# Altium PCB MCU_1.1.PcbDoc
Units mm, origin at the board's own origin, x right, y up, seen from the top; angles counter-clockwise.
Board outline 44.51 x 46.48 mm, 2 copper layers (Top Layer, Bottom Layer); 28 components, 35 nets, 165 pads, 109 vias.
Unrouted connection lines stored in the file: 1.
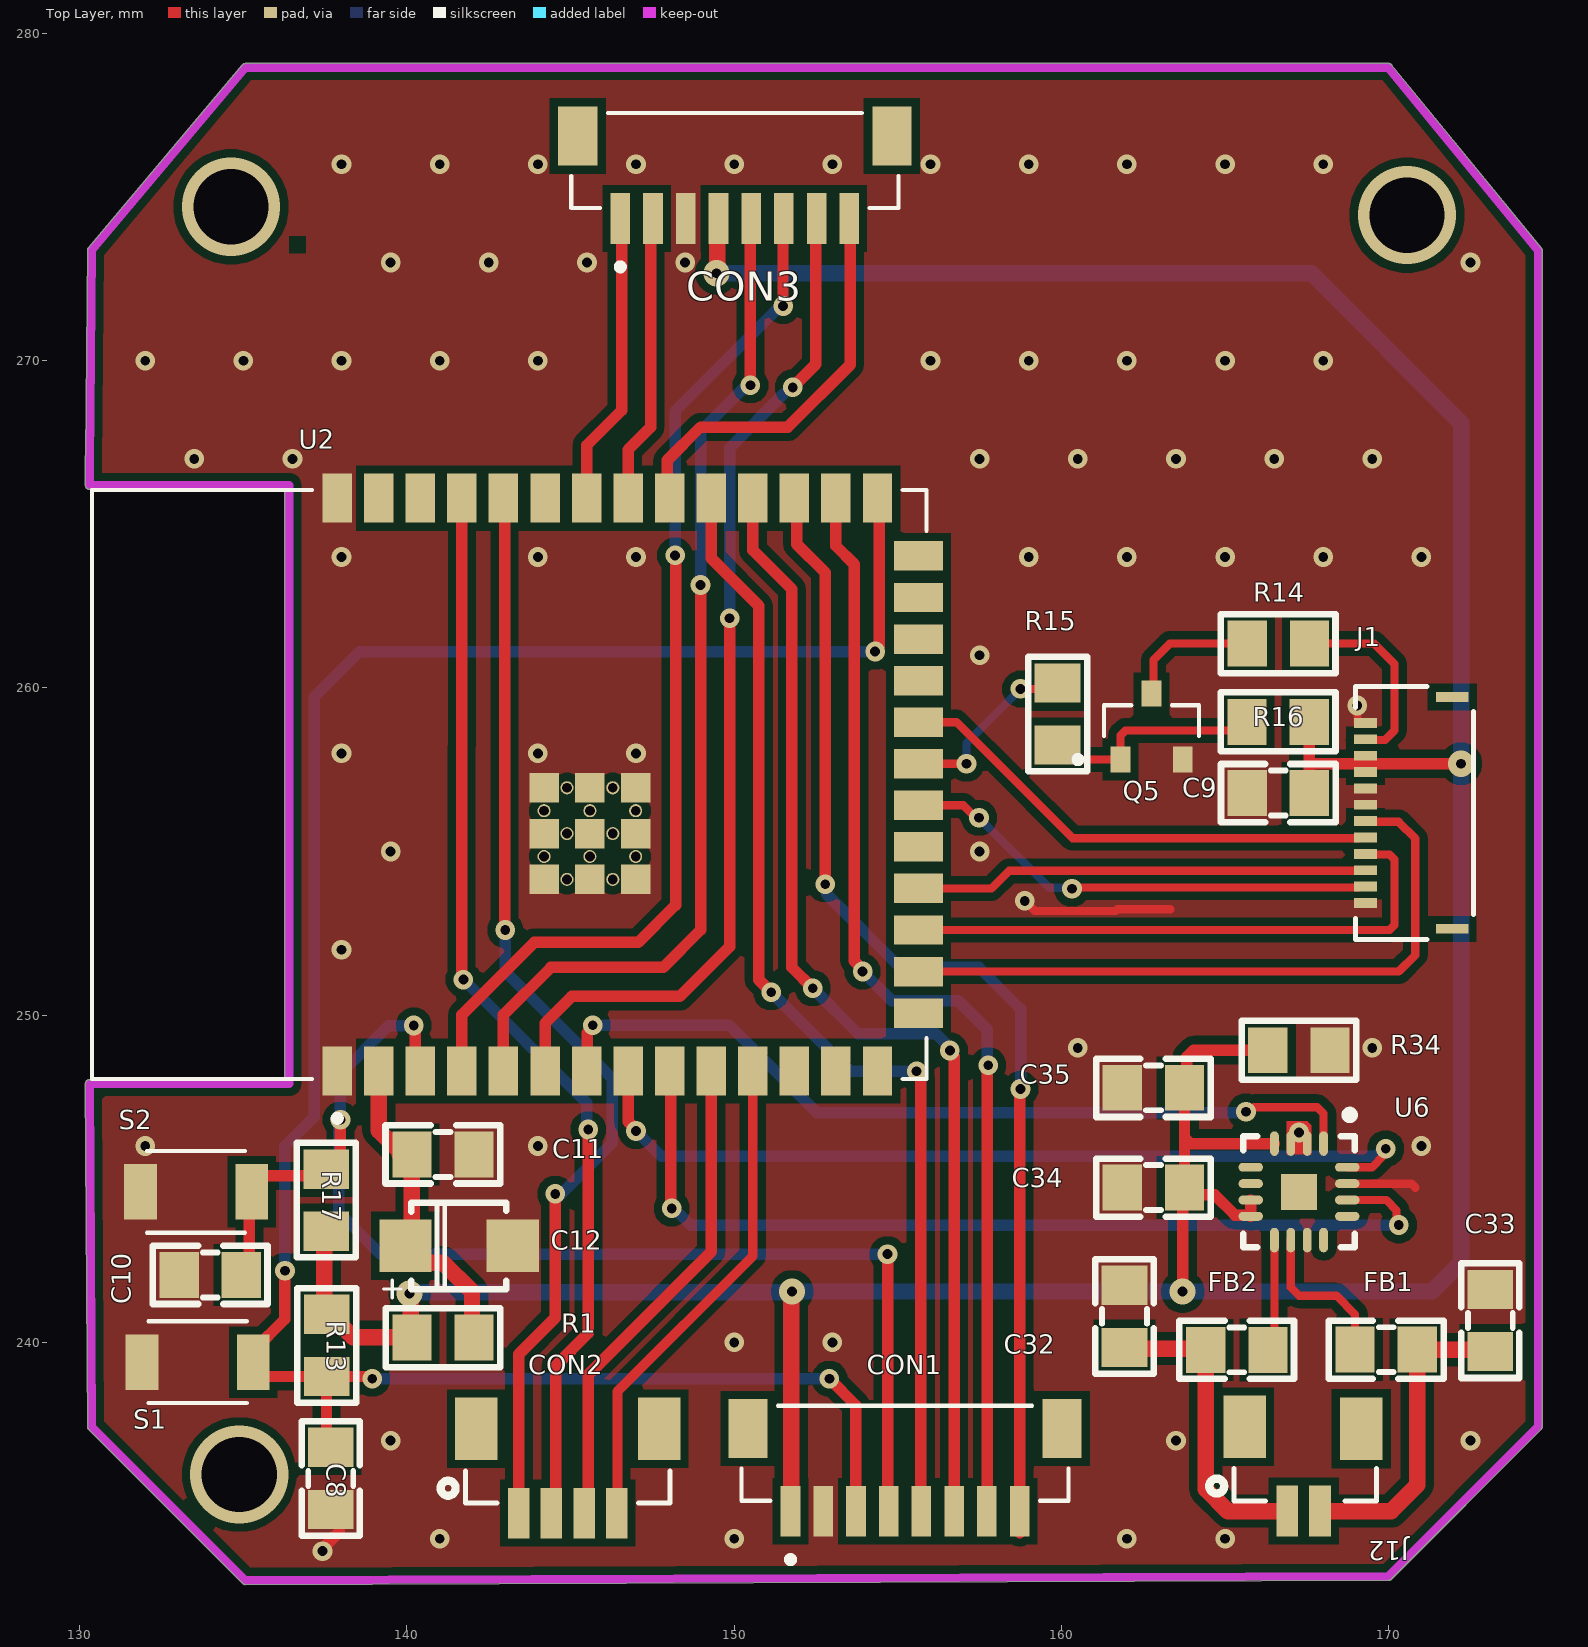
[diagram p0: Top Layer view]
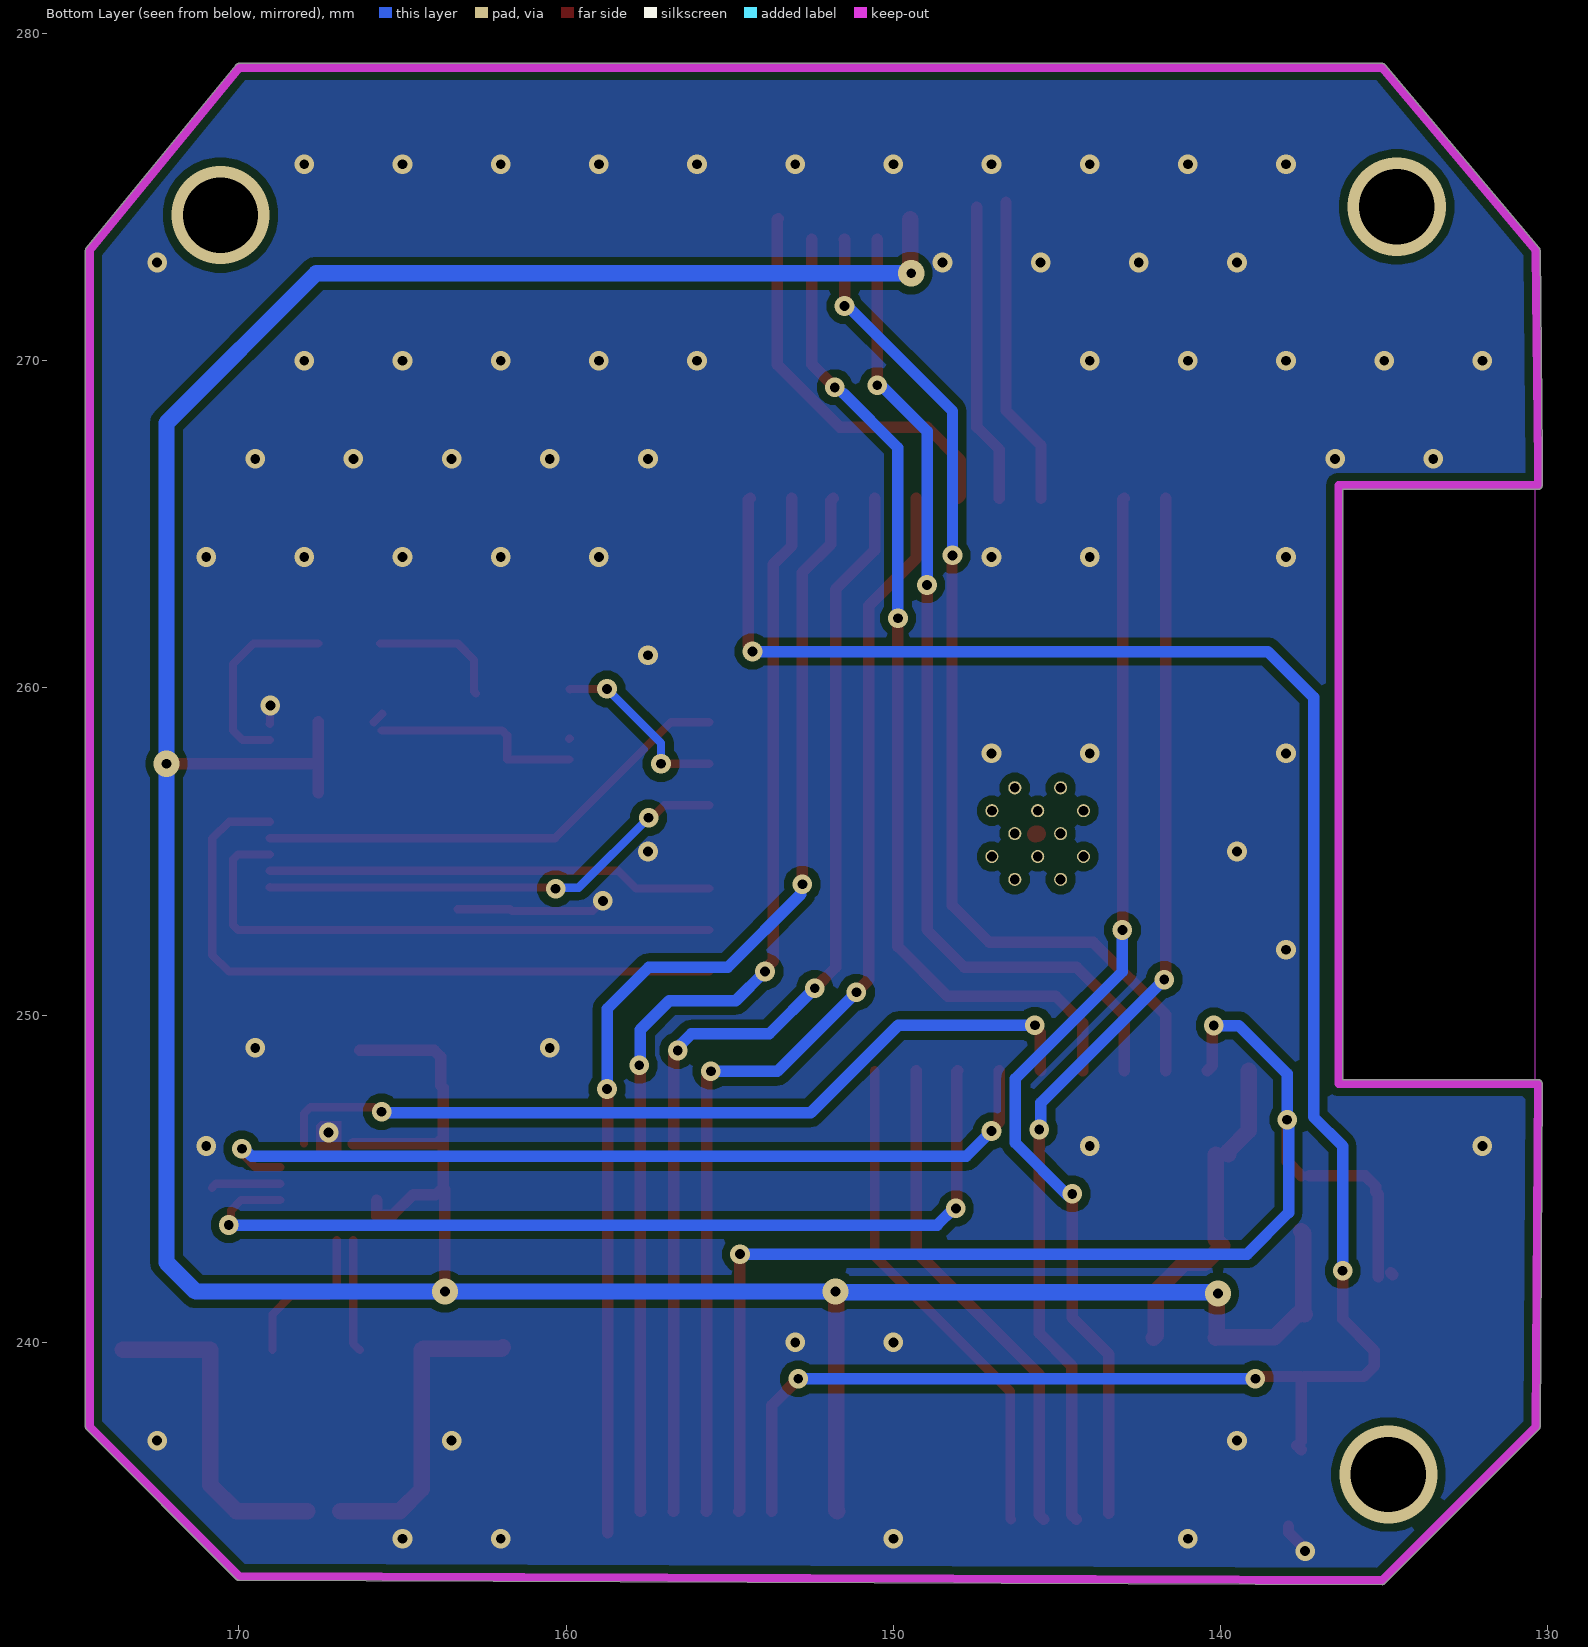
[diagram p1: Bottom Layer view, seen from below]
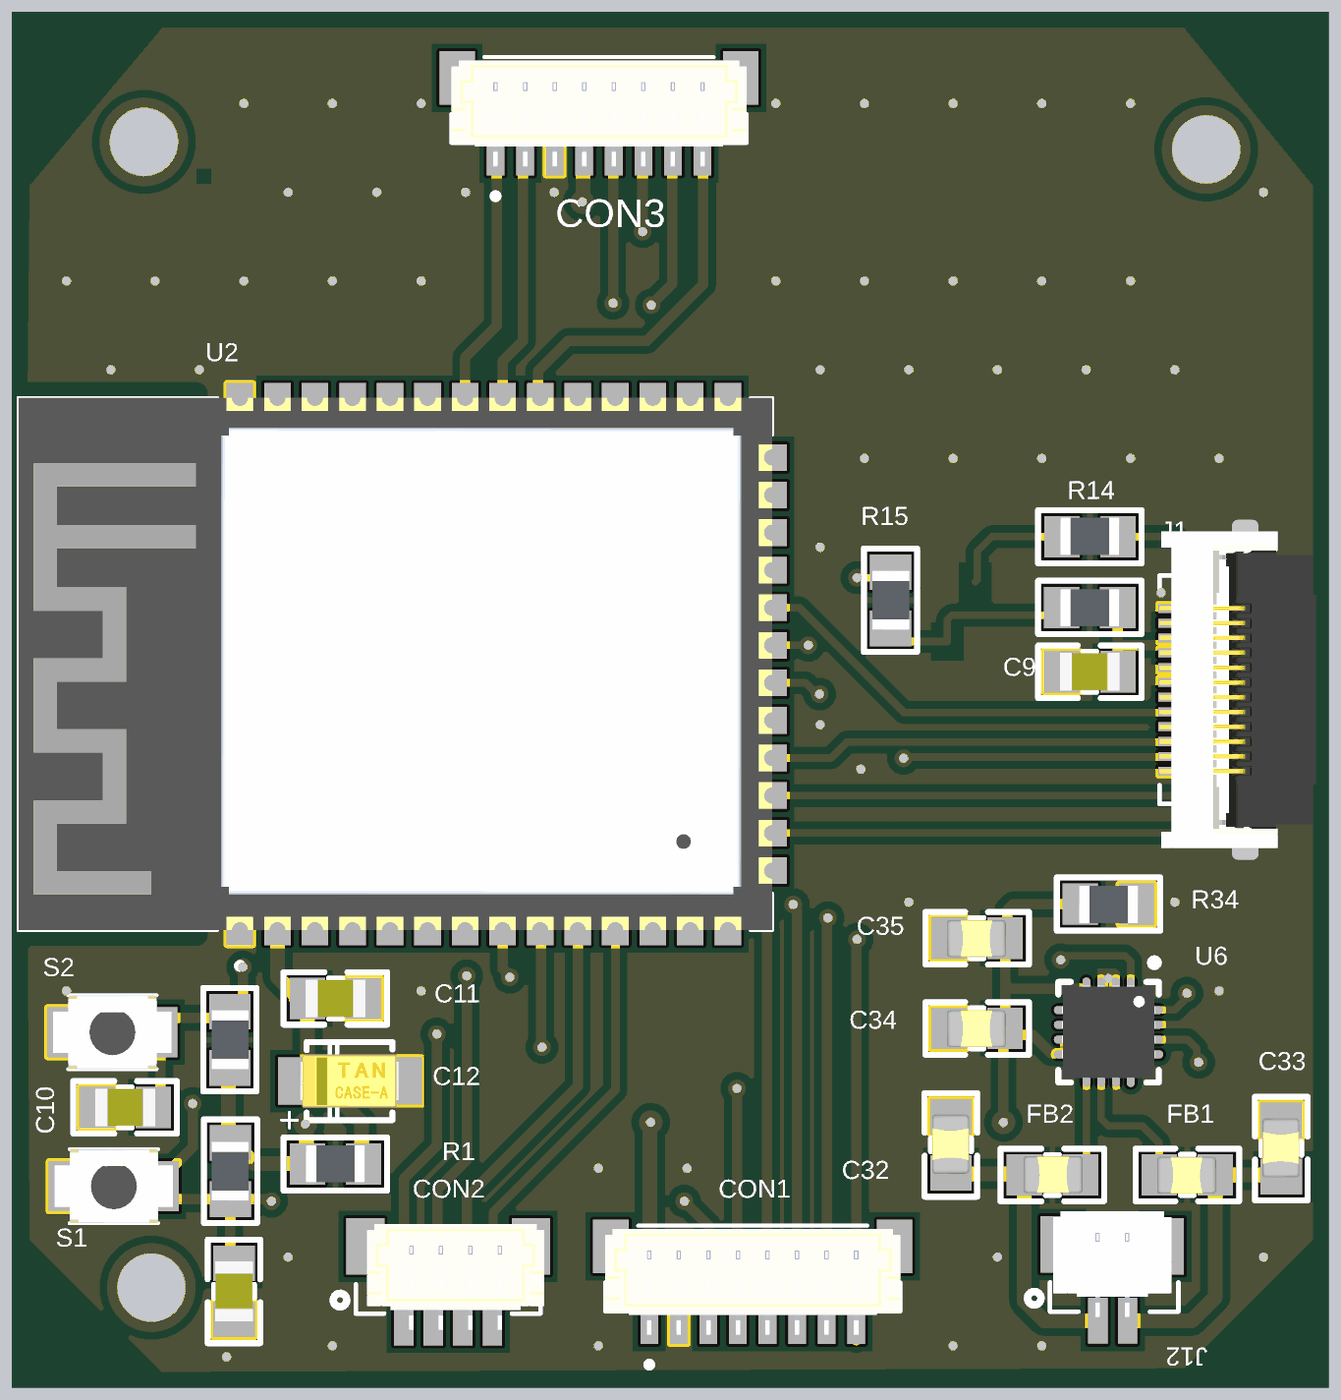
[diagram p2: 3D render of the assembled board from above, using the file's embedded part models]

## Layer stack, top to bottom
Top Solder: solder mask 0.0102, Solder Resist, Dk 3.5
Top Layer: signal copper 0.0356
Dielectric 1: dielectric 0.32, FR-4, Dk 4.8
Bottom Layer: signal copper 0.0356
Bottom Solder: solder mask 0.0102, Solder Resist, Dk 3.5

## Board outline
130.238,237.426 130.175,247.903 cw(c130.302,247.904) 130.302,248.031 136.271,248.031 136.271,266.065 130.302,266.065 cw(c130.302,266.192) 130.175,266.192 130.175,267.081 cw(c130.302,267.081) 130.177,267.106 130.238,273.369 cw(c130.366,273.367) 130.268,273.449 134.967,279.037 cw(c135.064,278.956) 135.064,279.083 169.989,279.083 cw(c169.99,278.956) 170.088,279.036 174.66,273.448 cw(c174.561,273.368) 174.689,273.368 174.689,237.427 cw(c174.562,237.426) 174.651,237.336 170.08,232.764 cw(c169.99,232.854) 169.99,232.727 135.065,232.6 cw(c135.064,232.727) 134.974,232.638 130.275,237.336 cw(c130.365,237.426)

## Design rules (kind name [scope] priority, off if disabled: settings)
Clearance [All] p1: gap=0.254 ignorepadtopadclearanceinfootprint=FALSE
DiffPairsRouting [All] p1: maxlimit=0.254 minlimit=0.127 mostfreqgap=0.254 toplayer_minwidth=0.254 toplayer_maxwidth=0.508 toplayer_prefwidth=0.381 bottomlayer_minwidth=0.254 bottomlayer_maxwidth=0.508 bottomlayer_prefwidth=0.381 maxuncoupledlength=12.7
PolygonConnect [All] p1: connectstyle=Direct reliefconductorwidth=0.254 reliefentries=4 polygonreliefangle="90 Angle" airgapwidth=0.254
RoomDefinition MCU [InComponentClass('MCU')] p1: confinementstyle=ConfineIn formatcopy=TRUE lockcomponents=FALSE outline 0,0 50.8,0 50.8,25.4 0,25.4
RoutingVias [All] p1: holewidth=0.3 width=0.6 viastyle="Through Hole" minholewidth=0.3 minwidth=0.6 maxholewidth=0.3 maxwidth=0.6
SolderMaskExpansion [All] p1: expansion=0.102 istentingtop=FALSE
Width [All] p1: maxlimit=0.5 minlimit=0.254 preferedwidth=0.35
29 further rules are at their usual default settings.

## Components (designator, comment, footprint, x,y, rotation, side; value= is the part's Value field where it differs from the comment)
C8 "104" "tu 0805" 137.668,235.839 r90 top
C9 "104" "tu 0805" 166.628,256.786 r180 top
C10 "104" "tu 0805" 133.985,242.062 r0 top
C11 "104" "tu 0805" 141.097,245.745 r0 top
C12 "10uF" CAP-TANTAL-1206(3216) 141.58,242.951 r0 top
C32 "220pF" "Cap 0805" 161.925,240.792 r90 top
C33 "220pF" "Cap 0805" 173.101,240.665 r90 top
C34 "10uF" "Cap 0805" 162.814,244.729 r180 top
C35 "0.1uF" "Cap 0805" 162.814,247.777 r180 top
CON1 "Header 8pin 1.0mm" JST_BM08B-SRSS-TB(LF)(SN) 155.22,236.613 r0 top
CON2 "Header 4pin 1.0mm" "CONN4_BM04B-SRSS_JST - duplicate" 144.913,236.665 r0 top
CON3 "Header 8pin 1.0mm" JST_BM08B-SRSS-TB(LF)(SN) 150.019,276.118 r0 top
FB1 "?" "Cap 0805" 169.926,239.776 r180 top
FB2 "?" "Cap 0805" 165.354,239.776 r0 top
J1 "TFT_1.54 inch" "FPC 12pin 0,5mm" 170.791,256.179 r90 top
J12 "Header 2pin 1.0mm_1" CONN2_BM02B-SRSS_JST 168.402,236.728 r0 top
Q5 "SS8050CTA" "SS8050 SMD" 627.065,827.653 r90 top
R1 "0R" "RES 0805" 141.097,240.157 r0 top
R13 "10K" "RES 0805" 137.541,239.903 r90 top
R14 "10R" "RES 0805" 166.624,261.366 r0 top
R15 "1K" "RES 0805" 159.893,259.207 r270 top
R16 "10K" "RES 0805" 166.624,258.953 r180 top
R17 "10K" "RES 0805" 137.541,244.348 r270 top
R34 "1M" "RES 0805" 167.259,248.92 r180 top
S1 "SW-SMD" SW_B3U-1000P 133.604,239.395 r180 top
S2 "SW-SMD" SW_B3U-1000P 133.555,244.602 r180 top
U2 "ESP32-S3-WROOM-1-N8R2" XCVR_ESP32-S3-WROOM-1-N8R2 143.129,257.048 r90 top
U6 "MAX98357A" QFN16N-3X3 167.259,244.602 r270 top

## Footprints (in the part's own frame and the unit in brackets; to place one, negate y for a bottom-side part, rotate by r counter-clockwise, add the part's x,y. Pads: shape width x height; smd on the part's side, far side on the other; paste and mask are expansions set on the pad)
"Cap 0805" [mm] "Compoment SMD 80x50mil"
  rect 1.2x1.4 smd: 1(-0.946,-0.003) 2(0.954,-0.003)
  silkscreen extent -1.75,-0.89 1.75,0.89, body extent -0.97,-0.61 1.03,0.64, height 1.23
CAP-TANTAL-1206(3216) [mm]
  rect 1.6x1.6 smd: 1(-1.626,0) 2(1.651,0)
  silkscreen extent -2.3,-1.59 1.45,1.32, body extent -1.7,-0.9 1.7,0.9, height 1.8
CONN2_BM02B-SRSS_JST [mil]
  rect 26x61 smd: 1(-59.06,-74.1) 2(-19.69,-74.1)
  rect 51x75 smd: 5(-110.24,27.47) 6(30,25)
  silkscreen extent -153,-62 48,-23, body extent -119,-70 39,72, height 167
"CONN4_BM04B-SRSS_JST - duplicate" [mil]
  rect 26x61 smd: 1(-59.06,-74.1) 2(-19.69,-74.1) 3(19.68,-74.1) 4(59.06,-74.1)
  rect 51x75 smd: 5(-110.24,27.47) 6(110.24,27.47)
  silkscreen extent -153,-62 123,-23, body extent -108,-85 128,57, height 171
"FPC 12pin 0,5mm" [mm]
  rect 0.3x0.7 smd: 1(-2.75,1.5) 2(-2.25,1.5) 3(-1.75,1.5) 4(-1.25,1.5) 5(-0.75,1.5) 6(-0.25,1.5) 7(0.25,1.5) 8(0.75,1.5) 9(1.25,1.5) 10(1.75,1.5) 11(2.25,1.5) 12(2.75,1.5)
  rect 0.3x1 smd: P1(-3.54,-1.15) P2(3.54,-1.15)
  silkscreen extent -3.86,-1.8 3.86,1.8, body extent -5.75,-3.49 5.75,1.81, height 1.9
JST_BM08B-SRSS-TB(LF)(SN) [mm]
  rect 0.6x1.55 smd: 1(-3.5,-1.775) 2(-2.5,-1.775) 3(-1.5,-1.775) 4(-0.5,-1.775) 5(0.5,-1.775) 6(1.5,-1.775) 7(2.5,-1.775) 8(3.5,-1.775)
  rect 1.2x1.8 smd: S1(-4.8,0.75) S2(4.8,0.75)
  silkscreen extent -5,-3.35 5,1.45, body extent -5,-2.27 5,1.33, height 4.25
QFN16N-3X3 [mm]
  oval 0.75x0.27 smd: 1(-1.475,0.75) 2(-1.475,0.25) 3(-1.475,-0.25) 4(-1.475,-0.75) 9(1.475,-0.75) 10(1.475,-0.25) 11(1.475,0.25) 12(1.475,0.75)
  oval 0.27x0.75 smd: 5(-0.75,-1.475) 6(-0.25,-1.475) 7(0.25,-1.475) 8(0.75,-1.475) 13(0.75,1.475) 14(0.25,1.475) 15(-0.25,1.475) 16(-0.75,1.475)
  rect 1.1x1.1 smd: 17(0,0)
  silkscreen extent -2.47,-1.7 1.7,1.7, body extent -1.57,-1.57 1.57,1.57, height 0.75
"RES 0805" [mm]
  rect 1.2x1.4 smd: 1(-0.946,-0.01) 2(0.954,-0.01)
  silkscreen extent -1.75,-0.91 1.75,0.89, body extent -1,-0.62 1,0.63, height 0.5
"SS8050 SMD" [mm]
  rect 0.8x0.6 smd: 1(-569.843,465.262) 2(-569.843,463.362) 3(-567.823,464.312)
  silkscreen extent -569.94,462.86 -568.18,466.66
SW_B3U-1000P [mm]
  rect 1x1.7 smd: 1(-1.7,0) 2(1.7,0)
  silkscreen extent -1.5,-1.25 1.5,1.25, body extent -2,-1.25 2,1.25, height 1.75
"tu 0805" [mm] "Compoment SMD 80x50mil"
  rect 1.2x1.4 smd: 1(-0.946,-0.003) 2(0.954,-0.003)
  silkscreen extent -1.75,-0.89 1.75,0.89, body extent -1.01,-0.64 1.01,0.63, height 0.61
XCVR_ESP32-S3-WROOM-1-N8R2 [mm]
  rect 1.5x0.9 smd: 1(-8.75,5.26) 2(-8.75,3.99) 3(-8.75,2.72) 4(-8.75,1.45) 5(-8.75,0.18) 6(-8.75,-1.09) 7(-8.75,-2.36) 8(-8.75,-3.63) 9(-8.75,-4.9) 10(-8.75,-6.17) 11(-8.75,-7.44) 12(-8.75,-8.71) 13(-8.75,-9.98) 14(-8.75,-11.25) 27(8.75,-11.25) 28(8.75,-9.98) 29(8.75,-8.71) 30(8.75,-7.44) 31(8.75,-6.17) 32(8.75,-4.9) 33(8.75,-3.63) 34(8.75,-2.36) 35(8.75,-1.09) 36(8.75,0.18) 37(8.75,1.45) 38(8.75,2.72) 39(8.75,3.99) 40(8.75,5.26)
  rect 0.9x1.5 smd: 15(-6.985,-12.5) 16(-5.715,-12.5) 17(-4.445,-12.5) 18(-3.175,-12.5) 19(-1.905,-12.5) 20(-0.635,-12.5) 21(0.635,-12.5) 22(1.905,-12.5) 23(3.175,-12.5) 24(4.445,-12.5) 25(5.715,-12.5) 26(6.985,-12.5)
  rect 0.9x0.9 smd: 41_1(-1.5,-2.46) 41_2(-2.9,-2.46) 41_3(-0.1,-2.46) 41_4(-2.9,-3.86) 41_5(-1.5,-3.86) 41_6(-0.1,-3.86) 41_7(-2.9,-1.06) 41_8(-1.5,-1.06) 41_9(-0.1,-1.06)
  round 0.4 hole 0.3 mask+0: 41_10(-1.5,-1.76) 41_11(-2.9,-1.76) 41_12(-0.1,-1.76) 41_13(-2.9,-3.16) 41_14(-1.5,-3.16) 41_15(-0.1,-3.16) 41_16(-2.2,-1.06) 41_17(-0.8,-1.06) 41_18(-2.2,-2.46) 41_19(-0.8,-2.46) 41_20(-2.2,-3.86) 41_21(-0.8,-3.86)
  Keep-Out Layer region: 9,6.75 -9,6.75 -9,12.75 9,12.75
  Keep-Out Layer region: 9,6.75 -9,6.75 -9,12.75 9,12.75
  silkscreen extent -10.3,-12.75 9,12.75, body extent -9,-12.75 9,12.75, height 3.25

## Part data
C8 C9 C10 C11: library part "Tu 0805 104 50V 10%", "Dán", Chung_Loai=Dán, Don_Vi=Con, Ma_Hang=MH004551, So_Chan=2, Ten_Linh_Kien="Tụ 0805 104-100nF 10% 50V"
C12: library part "CAP TANTAL", "CASE-____-18(mm) Tantalum Capacitors"
C32 C33 C34 C35: library part "Cap 0805", "Capacitor SMD 0805"
CON1 CON3: "SH Series 8 Position 1 mm Pitch Surface Mount Side Entry Shrouded Header", Package=None, Availability=Unavailable, MF="{'manufacturer': u'JST Sales America Inc.'}", MP=SM08B-SRSS-TB, Price=None
CON2 J12: "Connector Header Surface Mount, Right Angle 4 position 0.039 (1.00mm)", Package=None, Check_prices=https://www.snapeda.com/parts/SM04B-SRSS-TB/JST/view-part/?ref=eda, MF="JST Sales", MP=SM04B-SRSS-TB, SnapEDA_Link=https://www.snapeda.com/parts/SM04B-SRSS-TB/JST/view-part/?ref=snap
FB1 FB2: library part "Cap 0805", "errite Bead   0603 MMZ1608B121C - 120 Ohm @ 100MHz, 600mA, 0.15 Ohm DC Resistance - Digikey: 445-2164-1-ND  BK1608HW121-T - 120 Ohm, 600mA Ferrite Chip - Digikey: 587-1876-2-ND       0805 HZ0805B272R-10 - 2.7K Ohm @ 100MHz, 200mA, 0.8 Ohm DC Resistance - Digikey: 240-2504-1-ND (see also Murata BLM21BD272SN1L)  MMZ2012Y152B - 1.5K Ohm @ 100MHz, 500mA, 0.4 Ohm DC Resistance - Digikey: 445-1560-1-ND - Mainly for high frequency (80-400MHz)  MMZ2012R102A - 1K Ohm @ 100MHz, 500mA, 0.3 Ohm DC Resistance - Digikey: 445-1555-2-ND - More general purpose (10-200MHz)"
J1: library part "FPC 12pin", "FPC 12pin 0,5mm", Package=None, Availability=Unavailable, MF="{'manufacturer': u'Molex'}", MP=5034801200, Price=None
R1 R13 R14 R15 R16 R17 R34: library part "RES 0805", "RES SMD 0805", Manufacturer="Vishay Dale", Manufacturer Part Number=CRCW040210K0FKED, Operating Temperature="-55°C ~ 155°C", Package / Case="0402 (1005 Metric)", Power (Watts)="0.063W, 1/16W", Resistance (Ohms)=10k, Supplier Part Number 1=541-10.0KLCT-ND, Temperature Coefficient=±100ppm/°C, Tolerance=±1%, Category=Resistors, ComponentLink1Description=http://www.vishay.com/docs/20035/dcrcwe3.pdf, ComponentLink1URL=http://www.vishay.com/docs/20035/dcrcwe3.pdf, Composition="Thick Film", Features="Automotive AEC-Q200", Height="0.016\" (0.40mm)", Number of Terminations=2, Packaging="Cut Tape (CT)", Pricing 1="10=0.083, 50=0.0444, 200=0.0255, 1000=0.0174 (USD)", RoHS="RoHS Compliant", Size / Dimension="0.039\" L x 0.020\" W (1.00mm x 0.50mm)", Stock 1=2392462, Supplier 1=Digi-Key, Supplier Device Package="0402 (1005 Metric)"
S1 S2: "Switch", LatestRevisionDate=17-Jul-2002, LatestRevisionNote="Re-released for DXP Platform.", PackageReference=SPST-2, Published=24-Mar-1999, Publisher="Altium Limited"
U2: "WiFi 802.11a/b/g/n, Bluetooth v5.0 Transceiver Module 2.4GHz Antenna Not Included -", Package="- Espressif Systems", Availability="In Stock", Check_prices=https://www.snapeda.com/parts/ESP32-S3-WROOM-1-N8R2/Espressif+Systems/view-part/?ref=eda, MF="Espressif Systems", MP=ESP32-S3-WROOM-1-N8R2, Price=None, Purchase-URL=https://pricing.snapeda.com/search?q=ESP32-S3-WROOM-1-N8R2&ref=eda, SnapEDA_Link=https://www.snapeda.com/parts/ESP32-S3-WROOM-1-N8R2/Espressif+Systems/view-part/?ref=snap

## Via types
v1: diameter 0.6, hole 0.3, Top Layer to Bottom Layer, tented both sides, 101 vias
v2: diameter 0.8, hole 0.3, Top Layer to Bottom Layer, tented both sides, 5 vias
v3: diameter 3, hole 2.3, Top Layer to Bottom Layer, 3 vias

## Nets (pads, with @x,y where several pads share a name; then routed paths per layer and width w, separated by ;. In a path a pad name is that pad's centre, name@x,y a point inside that pad or via, vN(x,y) a via of type N, cw(c..) or ccw(c..) an arc to the next point about the centre after c; other vN are vias at no path point)
EN: C10.2 CON1.4 R17.1 S2.1 U2.3 | length 40.6
  Top Layer w0.35: C10.2@134.735,242.062 C10.2@134.805,242.131 ; C10.2@135.186,242.004 135.186,244.533 S2.1 135.255,244.761 135.58,245.086 R17.1@137.287,245.086 ; R17.1@137.541,245.098 137.967,245.524 v1(137.967,246.806) ; v1(140.208,249.682) 140.256,249.634 140.256,248.451 U2.3 ; v1(154.686,242.697) 154.69,242.693 154.69,234.868 CON1.4
  Bottom Layer w0.35: v1@137.922,246.761 137.922,243.967 139.192,242.697 v1(154.686,242.697) ; v1(137.967,246.806) 137.967,248.203 139.446,249.682 v1(140.208,249.682)
GND: C8.1 C9.2 C10.1 C11.2 C12.2 C32.2 C33.2 C34.2 C35.2 CON1.2 CON3.3 J1.1 J1.7 J1.8 J1.12 Q5.2 R34.1 S1.2 S2.2 U2.1 U2.40 U2.41_1 U2.41_2 U2.41_3 U2.41_4 U2.41_5 U2.41_6 U2.41_7 U2.41_8 U2.41_9 U6.2 U6.3 U6.11 U6.15 | length 8.7
  Top Layer w0.254: v1(158.877,253.492) 159.188,253.181 161.652,253.181 161.709,253.238 163.322,253.238 ; U6.3@167.134,246.077 167.134,246.195 167.259,246.32 v1(167.259,246.413) ; U6.15 170.692,244.852 170.815,244.729 ; v1(169.037,259.461) 169.049,259.449 169.049,258.921 J1.12@169.061,258.909
  Top Layer w0.35: v1(137.417,233.623) 137.417,233.691 137.925,234.199 C8.1@137.925,234.385
  Top Layer w0.5: U2.41_1 145.645,255.548 U2.41_1@145.669,255.524
  other v1: 141,234 150,234 162,234 165,234 139.5,237 163.5,237 172.5,237 150,240 153,240 132,246 144,246 171,246 160.5,249 169.5,249 138,252 139.5,255 157.5,255 138,258 144,258 147,258 157.5,261 138,264 144,264 147,264 159,264 162,264 165,264 168,264 171,264 133.5,267 136.5,267 157.5,267 160.5,267 163.5,267 166.5,267 169.5,267 132,270 135,270 138,270 141,270 144,270 156,270 159,270 162,270 165,270 168,270 139.5,273 142.5,273 145.5,273 148.5,273 172.5,273 138,276 141,276 144,276 147,276 150,276 153,276 156,276 159,276 162,276 165,276 168,276
IO0: C8.2 CON1.3 R13.1 S1.1 U2.27 | length 67.9
  Top Layer w0.35: v1(136.271,242.189) 136.271,240.712 135.304,239.745 S1.1 135.304,239.282 135.629,238.957 137.424,238.957 137.541,238.84 C8.2@137.541,236.977 ; C8.2@137.541,236.723 C8.2@137.668,236.85 ; R13.1 138.868,238.957 v1(138.938,238.887) ; v1(152.908,238.887) 153.72,238.075 CON1.3 ; v1(154.305,261.112) 154.305,261.18 154.431,261.306 154.431,265.746 U2.27
  Bottom Layer w0.35: v1(136.271,242.189) 136.271,245.999 137.16,246.888 137.16,259.715 138.557,261.112 v1(154.305,261.112) ; v1(138.938,238.887) v1(152.908,238.887)
IO4: CON3.6 U2.4 | length 31.5
  Top Layer w0.35: U2.4 141.679,250.01 143.891,252.222 147.066,252.222 148.209,253.365 148.209,264.033 v1(148.193,264.049) ; v1(151.495,271.669) 151.495,271.78 151.491,271.784 151.491,273.707 CON3.6@151.495,273.711
  Bottom Layer w0.35: v1(148.193,264.049) 148.193,268.462 v1@151.511,271.78
IO5: CON3.5 U2.5 | length 30.5
  Top Layer w0.35: U2.5 142.949,250.01 144.399,251.46 147.828,251.46 148.971,252.603 v1(148.971,263.144) ; v1(150.495,269.248) CON3.5@150.495,273.711
  Bottom Layer w0.35: v1(148.971,263.144) 148.971,267.843 v1@150.368,269.24
IO6: CON3.7 U2.6 | length 30.5
  Top Layer w0.35: U2.6 144.219,249.756 145.034,250.571 148.336,250.571 149.86,252.095 v1(149.86,262.128) ; v1(151.79,269.185) 151.79,269.189 152.495,269.894 CON3.7@152.495,273.711
  Bottom Layer w0.35: v1(149.86,262.128) 149.86,267.335 151.511,268.986
IO7: U2.7 U6.1 | length 26
  Top Layer w0.254: v1(165.639,247.046) 165.733,247.046 165.875,247.188 167.814,247.188 168.009,246.993 U6.1
  Top Layer w0.35: U2.7 145.516,248.324 145.516,249.461 145.676,249.622 v1(145.676,249.689)
  Bottom Layer w0.35: v1(145.676,249.689) 149.853,249.689 152.527,247.015 165.608,247.015 v1(165.639,247.046)
IO15: U2.8 U6.16 | length 26.8
  Top Layer w0.254: U6.16 169.49,245.352 169.843,245.705 169.843,245.852 v1(169.909,245.918)
  Top Layer w0.35: U2.8 146.759,246.746 147,246.505 v1(147,246.461)
  Bottom Layer w0.35: v1(147,246.461) 147.777,245.684 169.608,245.684 169.842,245.918 v1(169.909,245.918)
IO16: U2.9 U6.14 | length 28.8
  Top Layer w0.254: U6.14 168.736,244.35 169.928,244.35 170.241,244.038 170.241,243.652 v1(170.307,243.586)
  Top Layer w0.35: U2.9 148.06,248.267 148.06,244.125 v1(148.09,244.094)
  Bottom Layer w0.35: v1(148.09,244.094) 148.158,244.094 148.666,243.586 v1(170.307,243.586)
IO39: CON3.8 U2.32 | length 12.5
  Top Layer w0.35: U2.32 147.955,265.872 147.955,266.954 148.971,267.97 151.638,267.97 153.543,269.875 153.543,274.319 CON3.8
IO40: CON3.2 U2.33 | length 9.2
  Top Layer w0.35: U2.33 146.759,267.282 147.447,267.97 CON3.2@147.447,274.69
IO41: CON3.1 U2.34 | length 9.5
  Top Layer w0.35: U2.34 145.489,267.409 146.558,268.478 CON3.1@146.558,274.839
NetC11_1: C11.1 C12.1 R1.2 U2.2 | length 9.7
  Top Layer w0.5: U2.2 139.139,246.473 139.77,245.842 C11.1@139.77,245.742 ; C11.1 140.151,243.148 C12.1 140.467,242.438 141.102,242.438 141.986,241.554 141.986,240.212 R1.2
NetC32_1: C32.1 FB2.1 J12.1 | length 9.5
  Top Layer w0.5: C32.1 161.965,239.81 164.372,239.81 FB2.1 164.408,235.515 165.077,234.846 J12.1
NetC33_1: C33.1 FB1.1 J12.2 | length 10.1
  Top Layer w0.5: J12.2 170.076,234.846 170.872,235.642 FB1.1 170.875,239.776 C33.1@173.549,239.776
NetFB1_2: FB1.2 U6.10 | length 4.8
  Top Layer w0.254: U6.10 167.009,241.677 167.259,241.427 168.402,241.427 168.972,240.857 FB1.2
NetFB2_2: FB2.2 U6.9 | length 3.4
  Top Layer w0.254: FB2.2 166.509,239.973 U6.9
NetJ1_11: J1.11 R14.2 | length 6.1
  Top Layer w0.254: R14.2 169.555,261.356 170.18,260.731 170.18,258.699 169.89,258.409 J1.11@169.061,258.409
NetQ5_1: Q5.1 R15.2 R16.2 | length 6.9
  Top Layer w0.254: R15.2@159.893,258.457 R15.2@159.905,258.445 ; R15.2@159.905,257.81 Q5.1 161.803,258.55 161.952,258.699 R16.2@165.632,258.699 ; R16.2@165.62,259.207 R16.2@165.874,258.953
NetQ5_3: Q5.3 R14.1 | length 4.1
  Top Layer w0.254: Q5.3 162.814,259.891 162.814,260.858 163.312,261.356 R14.1
RX_0: CON2.1 U2.36 | length 33.6
  Top Layer w0.35: U2.36 142.986,265.761 142.986,252.619 v1(143.002,252.603) ; CON2.1 143.419,234.789 143.419,239.637 144.532,240.75 v1(144.532,244.539)
  Bottom Layer w0.35: v1(143.002,252.603) 143.002,251.333 146.271,248.064 146.271,246.093 v1@144.653,244.475
RX_1: CON2.4 U2.11 | length 15.4
  Top Layer w0.3: CON2.4@146.407,234.592 146.431,234.616 146.431,238.506 150.569,242.644 U2.11
SD_CS: CON1.5 U2.31 | length 34.8
  Top Layer w0.35: U2.31 149.299,263.959 150.749,262.509 150.749,251.079 v1(151.13,250.698) ; v1(155.575,248.285) 155.575,248.217 155.702,248.09 155.702,234.856 CON1.5
  Bottom Layer w0.35: v1(151.13,250.698) 153.543,248.285 v1(155.575,248.285)
SD_MISO: CON1.6 U2.30 | length 34.8
  Top Layer w0.35: U2.30 150.569,264.213 151.765,263.017 151.765,251.46 v1(152.4,250.825) ; v1(156.591,248.92) 156.591,248.852 156.718,248.725 156.718,234.84 CON1.6
  Bottom Layer w0.35: v1(152.4,250.825) 153.797,249.428 156.175,249.428 156.466,249.137 156.466,249.113 v1@156.543,249.035
SD_MOSI: CON1.7 U2.28 | length 33.9
  Top Layer w0.35: U2.28 153.109,264.34 153.67,263.779 153.67,251.655 153.924,251.401 v1(153.924,251.333) ; CON1.7 157.729,234.847 157.729,248.433 v1(157.764,248.468)
  Bottom Layer w0.35: v1(153.924,251.333) 154.813,250.444 156.845,250.444 157.734,249.555 v1@157.734,248.666
SD_SCK: CON1.8 U2.29 | length 35.9
  Top Layer w0.35: U2.29 151.914,265.723 151.914,264.392 152.781,263.525 v1(152.781,254) ; CON1.8@158.722,234.188 158.722,247.716 v1(158.75,247.744)
  Bottom Layer w0.35: v1(152.781,254) 152.829,253.952 152.829,253.698 155.067,251.46 157.48,251.46 158.75,250.19 v1(158.75,247.744)
TFT_BL: R15.1 U2.21 | length 5.6
  Top Layer w0.254: U2.21 v1(157.099,257.683) ; v1(158.75,259.969) 159.881,259.969 R15.1@159.893,259.957
  Bottom Layer w0.254: v1(157.099,257.683) 157.099,258.318 v1(158.75,259.969)
TFT_CS: J1.5 U2.22 | length 14.9
  Top Layer w0.254: U2.22 156.792,258.953 160.336,255.409 J1.5@169.061,255.409
TFT_MOSI: J1.3 U2.18 | length 13.7
  Top Layer w0.254: U2.18 157.861,253.873 158.397,254.409 J1.3@169.061,254.409
TFT_RS: J1.6 U2.16 | length 20.9
  Top Layer w0.254: U2.16 170.307,251.333 170.815,251.841 170.815,255.397 170.303,255.909 J1.6@169.061,255.909
TFT_RST: J1.2 U2.20 | length 14.5
  Top Layer w0.254: U2.20 157.005,256.413 157.386,256.032 v1(157.48,256.032) ; v1(160.321,253.862) 160.363,253.903 169.055,253.903 J1.2@169.061,253.909
  Bottom Layer w0.254: v1(157.48,256.032) 159.614,253.898 160.286,253.898 v1(160.321,253.862)
TFT_SCK: J1.4 U2.17 | length 17.8
  Top Layer w0.254: U2.17 170.031,252.603 170.18,252.752 170.18,254.76 170.031,254.909 J1.4@169.061,254.909
TX_0: CON2.2 U2.37 | length 33.3
  Top Layer w0.35: U2.37 141.679,258.219 141.671,258.211 141.671,251.208 141.725,251.154 v1(141.725,251.086) ; CON2.2@144.407,234.592 144.546,234.73 144.546,239.288 145.542,240.284 v1(145.542,246.507)
  Bottom Layer w0.35: v1(141.725,251.086) 145.494,247.317 145.494,246.555 v1(145.542,246.507)
TX_1: CON2.3 U2.10 | length 15.3
  Top Layer w0.35: CON2.3@145.407,234.592 145.542,234.727 145.542,239.014 149.299,242.771 U2.10
VCC: C9.1 C34.1 C35.1 CON1.1 CON3.4 J1.9 J1.10 R1.1 R13.2 R16.1 R17.2 R34.2 U6.4 U6.7 U6.8 | length 120.4
  Top Layer w0.35: v2(163.703,241.554) 163.703,244.676 C34.1 ; U6.7 U6.8 165.744,243.892 165.302,243.892 164.68,244.514 163.978,244.514 C34.1 ; R34.2 164.035,248.93 163.83,248.725 163.83,247.851 C35.1 163.76,246.256 ; U6.4 163.939,246.077 163.76,246.256 ; R16.1 167.57,257.683 ; C9.1 167.57,256.794 167.57,257.683 ; v2(172.212,257.683) 167.57,257.683 ; C34.1 163.76,246.256
  Top Layer w0.5: R13.2@137.424,240.857 137.477,240.911 137.477,243.34 R17.2 ; R13.2 137.651,240.857 138.351,240.157 R1.1@140.141,240.157 ; v2(140.081,241.497) 140.116,241.462 140.116,240.182 R1.1@140.141,240.157 ; R1.1 R1.1@140.141,240.157 ; v2(149.455,272.672) 149.487,272.704 CON3.4@149.487,274.323 ; CON1.1 151.744,234.862 151.744,241.533 v2(151.769,241.558)
  Bottom Layer w0.5: v2@140.081,241.527 151.738,241.527 v2(151.769,241.558) 151.771,241.556 163.701,241.556 v2(163.703,241.554) 171.323,241.554 172.212,242.443 v2(172.212,257.683) 172.212,268.097 167.64,272.669 v2@149.455,272.669
pads on no net: CON1.S1 CON1.S2 CON2.5 CON2.6 CON3.S1 CON3.S2 J1.P1 J1.P2 J12.5 J12.6 U2.12 U2.13 U2.14 U2.15 U2.19 U2.23 U2.24 U2.25 U2.26 U2.35 U2.38 U2.39 U2.41_10 U2.41_11 U2.41_12 U2.41_13 U2.41_14 U2.41_15 U2.41_16 U2.41_17 U2.41_18 U2.41_19 U2.41_20 U2.41_21 U6.5 U6.6 U6.12 U6.13 U6.17
copper on no net:
  other v3: 134.874,235.966 170.561,274.447 134.62,274.701

## Polygon pours and split planes (outlines as drawn)
GND on Bottom Layer "GND_L02_P007" (solid, pour order 7): 130.429,266.319 130.429,274.193 135.128,278.892 169.926,278.892 174.625,274.193 174.625,237.236 170.053,232.664 135.001,232.664 130.429,237.236 130.429,247.523 130.302,247.65 130.493,247.84 136.462,247.84 136.398,247.904 136.398,266.192 130.556,266.192
GND on Top Layer "GND_L01_P009" (solid, pour order 9): 130.429,266.319 130.429,274.193 135.128,278.892 169.926,278.892 174.625,274.193 174.625,237.236 170.053,232.664 135.001,232.664 130.429,237.236 130.429,247.523 130.302,247.65 130.493,247.84 136.462,247.84 136.398,247.904 136.398,266.192 130.556,266.192

## Keep-outs
Keep-Out Layer:
  lines w0.254: 130.302,266.637 130.302,267.081 130.302,266.192 ; 130.302,266.859 130.365,273.368 135.064,278.955 169.989,278.955 174.561,273.368 174.561,237.427 169.989,232.855 135.064,232.727 130.365,237.427 130.302,247.904 136.398,247.904 136.398,266.192 ; 135.591,266.192 130.302,266.192 ; 136.144,266.192 136.398,266.192 ; 130.302,266.192 136.398,266.192

## Other copper
Top Layer:
  region net GND: 166.878,246.761 167.513,246.761 167.64,246.634 167.64,245.745 166.878,245.745

## Text inside footprints (layer, text, board x,y; h text height)
U2: Mechanical 13 "ANTENNA" at 133.629,252.548 h1 r90